# Altium PCB PCB.PcbDoc (part 2 of 2)
Units mm, origin at the board's own origin, x right, y up, seen from the top; angles counter-clockwise.
Board outline 38 x 40 mm, 4 copper layers (Top Layer, Inner GND 1, Inner GND 2, Bottom Layer), stack 1.62 mm thick; 82 components, 76 nets, 342 pads, 250 vias.
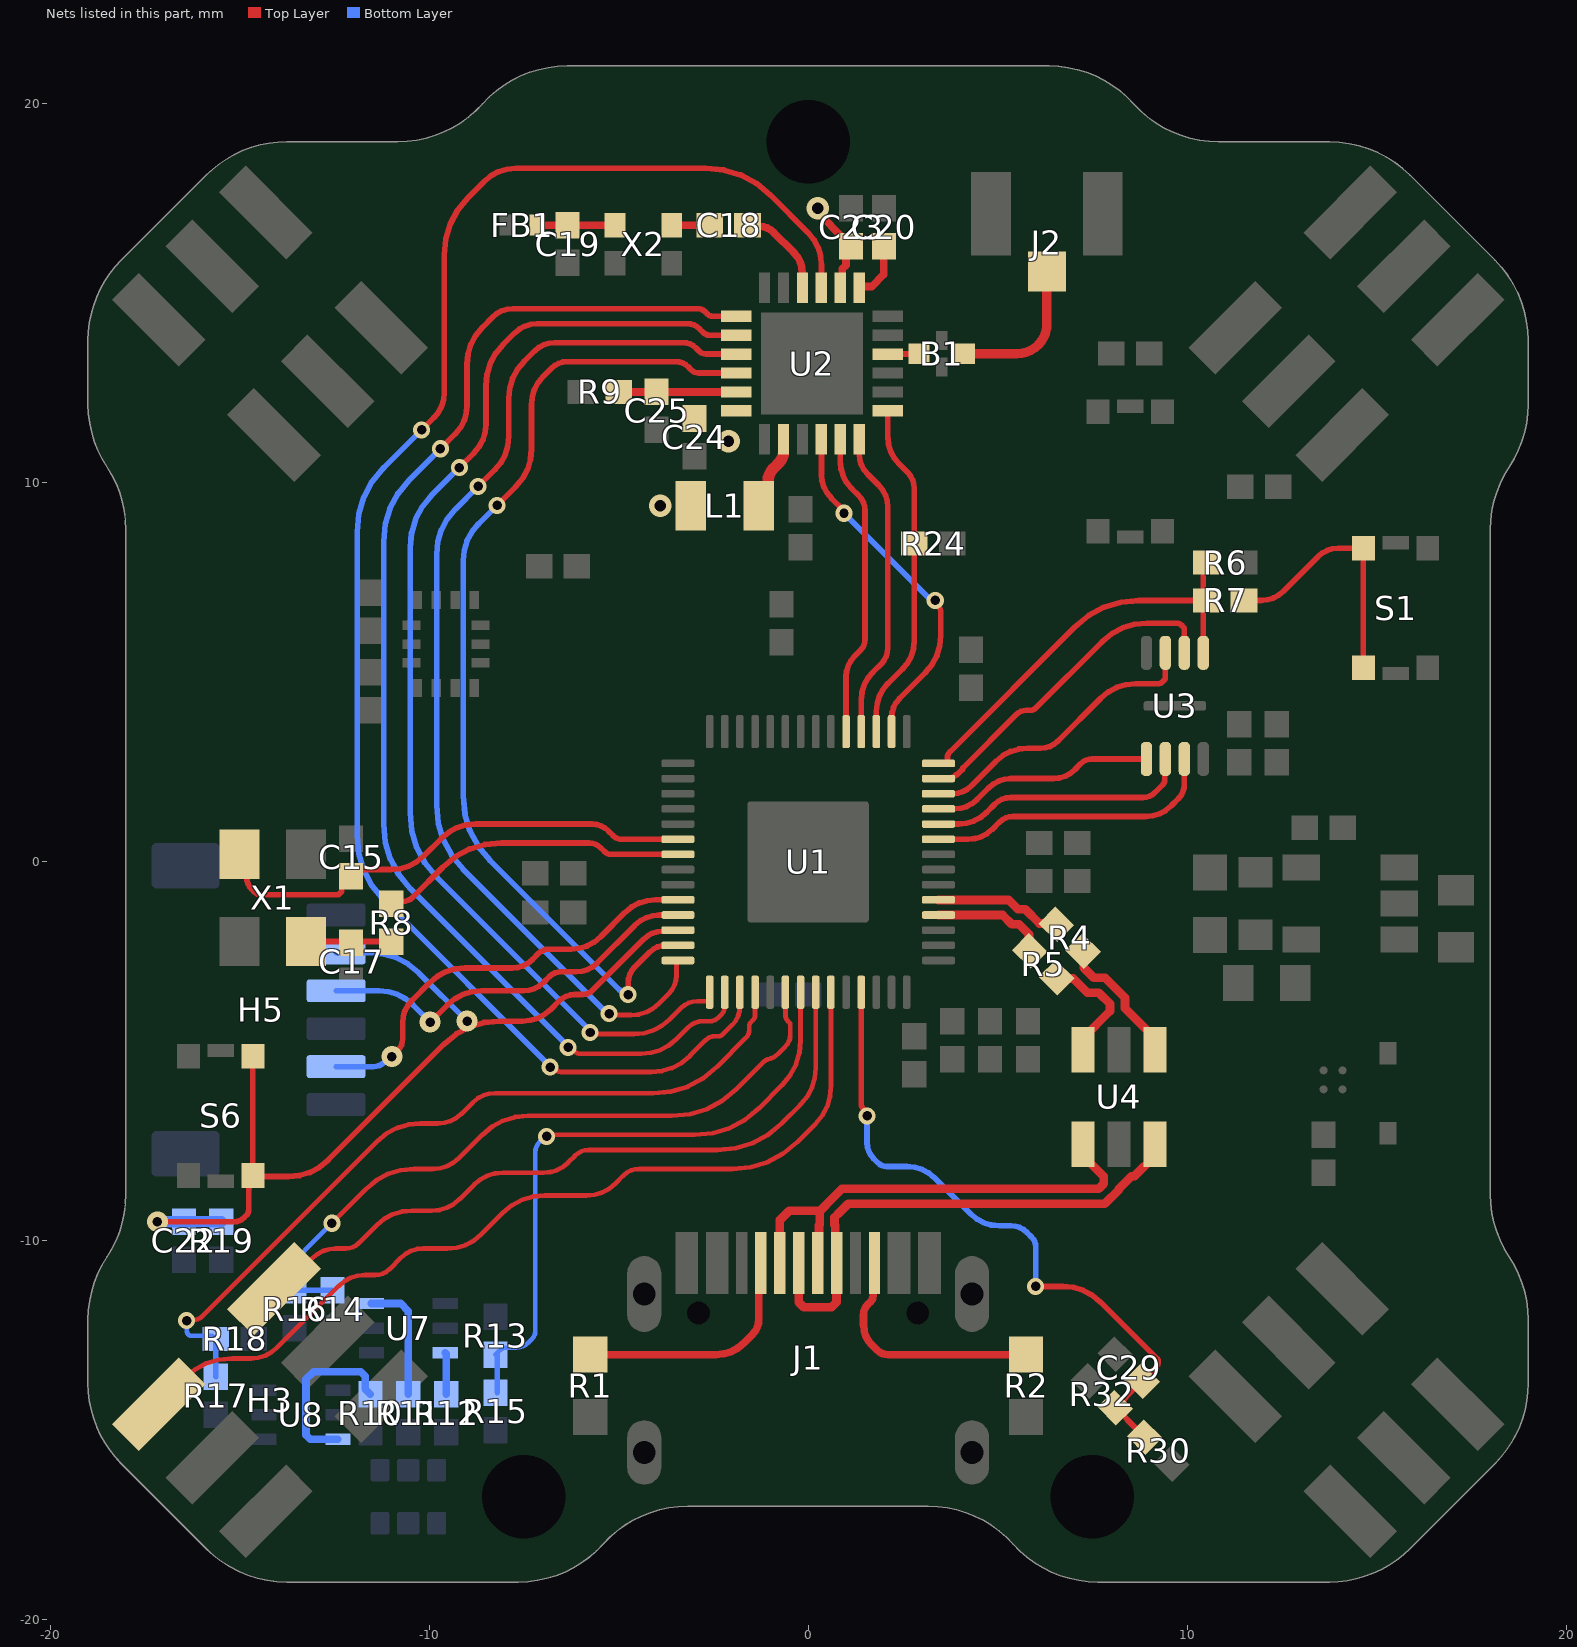
[diagram p4: the nets of this part, all layers, seen from the top]

## Via types
v1: diameter 0.55, hole 0.25, Top Layer to Bottom Layer, tented both sides, 204 vias
v2: diameter 0.45, hole 0.25, Top Layer to Bottom Layer, tented both sides, 30 vias
v3: diameter 0.6, hole 0.3, Top Layer to Bottom Layer, tented both sides, 10 vias
v4: diameter 0.5, hole 0.25, Top Layer to Bottom Layer, tented both sides, 3 vias
v5: diameter 0.5, hole 0.3, Top Layer to Bottom Layer, tented both sides, 2 vias
v6: diameter 0.45, hole 0.2, Top Layer to Bottom Layer, tented both sides, 1 vias

## Nets (pads, with @x,y where several pads share a name; then routed paths per layer and width w, separated by ;. In a path a pad name is that pad's centre, name@x,y a point inside that pad or via, vN(x,y) a via of type N, cw(c..) or ccw(c..) an arc to the next point about the centre after c; other vN are vias at no path point) (continued)
MCU_RGB_B: R17.1 R18.1 U1.32 | length 21
  Top Layer w0.125: v2(-16.4,-12.1) -16.391,-12.091 -16.387,-12.088 -16.383,-12.085 -16.378,-12.084 -16.373,-12.083 -16.214,-12.083 -16.151,-12.078 -16.093,-12.06 -16.04,-12.032 -15.991,-11.991 -11.377,-7.377 -11.126,-7.168 -10.851,-7.019 -10.55,-6.93 -10.225,-6.9 -9.771,-6.9 -9.592,-6.884 -9.427,-6.834 -9.276,-6.752 -9.137,-6.637 -8.842,-6.342 -8.715,-6.236 -8.575,-6.16 -8.423,-6.115 -8.258,-6.1 -4.084,-6.1 -3.61,-6.057 -3.172,-5.926 -2.77,-5.709 -2.404,-5.404 -1.644,-4.644 -1.605,-4.597 -1.577,-4.545 -1.56,-4.488 -1.554,-4.426 -1.554,-4.341 -1.551,-4.307 -1.542,-4.276 -1.526,-4.247 -1.504,-4.221 -1.447,-4.164 -1.426,-4.139 -1.412,-4.112 -1.403,-4.082 -1.4,-4.05 U1.32@-1.4,-3.437
  Bottom Layer w0.125: v2(-16.4,-12.1) -16.396,-12.104 -16.395,-12.105 -16.394,-12.107 -16.394,-12.109 -16.393,-12.111 -16.393,-12.38 -16.391,-12.403 -16.385,-12.423 -16.375,-12.442 -16.36,-12.46 -16.338,-12.482 -16.329,-12.49 -16.318,-12.495 -16.307,-12.499 -16.295,-12.5 -15.775,-12.5 -15.748,-12.502 -15.723,-12.51 -15.701,-12.522 -15.68,-12.539 R18.1@-15.654,-12.566
  Bottom Layer w0.15: R18.1@-15.654,-12.566 -15.644,-12.577 -15.637,-12.589 -15.633,-12.603 -15.632,-12.618 R17.1@-15.632,-13.587
MCU_RGB_G: R14.1 R16.1 U1.34 | length 18.2
  Top Layer w0.125: v2(-12.567,-9.533) -11.654,-8.62 -11.381,-8.393 -11.08,-8.23 -10.753,-8.132 -10.399,-8.1 -9.904,-8.1 -9.71,-8.082 -9.53,-8.028 -9.364,-7.939 -9.214,-7.814 -8.601,-7.201 -8.338,-6.982 -8.048,-6.825 -7.733,-6.731 -7.391,-6.7 -3.6,-6.7 -3.118,-6.656 -2.673,-6.523 -2.265,-6.302 -1.893,-5.993 -1.171,-5.271 -1.148,-5.251 -1.123,-5.234 -1.097,-5.22 -1.068,-5.21 -0.995,-5.188 -0.943,-5.169 -0.894,-5.144 -0.848,-5.113 -0.807,-5.076 -0.603,-4.872 -0.545,-4.802 -0.504,-4.726 -0.479,-4.643 -0.471,-4.554 -0.471,-4.354 -0.471,-4.34 -0.471,-4.326 -0.471,-4.312 -0.472,-4.299 -0.473,-4.265 -0.489,-4.246 -0.533,-4.201 -0.563,-4.166 -0.583,-4.127 -0.596,-4.085 -0.6,-4.04 U1.34@-0.6,-3.437
  Bottom Layer w0.125: R16.1@-13.528,-11.277 -13.512,-11.262 -13.507,-11.256 -13.503,-11.249 -13.501,-11.241 -13.5,-11.232 -13.5,-10.811 -13.485,-10.645 -13.439,-10.491 -13.363,-10.35 -13.256,-10.222 v2(-12.567,-9.533)
  Bottom Layer w0.15: R16.1@-13.528,-11.277 -13.536,-11.294 -13.518,-11.3 R14.1@-12.55,-11.3
MCU_RGB_R: R13.1 R15.1 U1.35 | length 16.8
  Top Layer w0.125: v2(-6.9,-7.241) -6.877,-7.219 -6.867,-7.211 -6.857,-7.205 -6.845,-7.201 -6.832,-7.2 -3,-7.2 -2.518,-7.156 -2.073,-7.023 -1.665,-6.802 -1.293,-6.493 -0.692,-5.892 -0.477,-5.633 -0.323,-5.349 -0.231,-5.04 -0.2,-4.704 U1.35@-0.2,-3.437
  Bottom Layer w0.125: R13.1@-8.25,-13 -8.149,-12.899 -8.105,-12.862 -8.057,-12.836 -8.005,-12.821 -7.948,-12.816 -7.71,-12.816 -7.617,-12.807 -7.53,-12.781 -7.45,-12.738 -7.378,-12.678 -7.28,-12.58 -7.245,-12.538 -7.22,-12.492 -7.205,-12.441 -7.2,-12.387 -7.2,-7.665 -7.193,-7.585 -7.171,-7.512 -7.135,-7.445 -7.084,-7.384 -6.955,-7.255 -6.948,-7.249 -6.94,-7.245 -6.932,-7.242 -6.923,-7.241 v2(-6.9,-7.241)
  Bottom Layer w0.15: R15.1@-8.2,-14 R13.1@-8.2,-13
MCU_RUN: C22.2 H5.5 R19.1 S6.3 S6.4 U1.26 | length 26
  Top Layer w0.15: v1(-17.169,-9.492) -15.139,-9.492 -15.068,-9.486 -15.003,-9.466 -14.943,-9.434 -14.888,-9.388 -14.818,-9.318 -14.793,-9.288 -14.775,-9.255 -14.765,-9.219 -14.761,-9.18 -14.761,-8.668 -14.755,-8.599 -14.736,-8.535 -14.704,-8.477 -14.66,-8.424 -14.592,-8.356 -14.562,-8.331 -14.53,-8.314 -14.495,-8.303 -14.457,-8.3 -13.711,-8.3 -13.417,-8.273 -13.145,-8.192 -12.895,-8.057 -12.668,-7.868 -9.605,-4.805 -9.287,-4.54 -8.937,-4.351 -8.557,-4.238 -8.145,-4.2 -7.545,-4.2 -7.331,-4.18 -7.133,-4.121 -6.951,-4.023 -6.785,-3.885 -6.573,-3.673 -6.482,-3.597 -6.382,-3.543 -6.273,-3.511 -6.155,-3.5 -5.96,-3.5 -5.883,-3.493 -5.812,-3.472 -5.746,-3.436 -5.687,-3.387 -4.336,-2.036 -4.225,-1.944 -4.103,-1.878 -3.97,-1.838 -3.827,-1.825 -3.478,-1.825 -3.471,-1.824 -3.464,-1.822 -3.457,-1.819 -3.451,-1.814 U1.26@-3.437,-1.8 ; S6.3@-14.65,-8.275 S6.4@-14.65,-5.125
  Bottom Layer w0.15: H5.5@-12.455,-2.4 -11.545,-2.4 -11.186,-2.433 -10.855,-2.532 -10.55,-2.696 -10.273,-2.927 v1(-9,-4.2)
  Bottom Layer w0.3: v1(-17.169,-9.492) -16.784,-9.492 -16.627,-9.492 C22.2@-16.469,-9.492 -16.312,-9.492 -16.154,-9.492 R19.1@-15.485,-9.492
MCU_SENSE_VBAT: C29.2 R30.1 R32.2 U1.39 | length 17.3
  Top Layer w0.15: U1.39@1.4,-3.437 1.4,-6.367 1.404,-6.414 1.417,-6.458 1.439,-6.498 1.469,-6.534 1.528,-6.593 1.539,-6.607 1.548,-6.621 1.552,-6.638 1.554,-6.655 v2(1.554,-6.7) ; v2(6,-11.2) 6.715,-11.2 6.997,-11.226 7.257,-11.303 7.496,-11.433 7.714,-11.614 9.216,-13.116 9.226,-13.128 9.232,-13.14 9.237,-13.154 9.238,-13.169 9.238,-13.206 9.235,-13.233 9.228,-13.258 9.216,-13.281 9.198,-13.302 8.982,-13.518 8.895,-13.605 C29.2@8.807,-13.693 8.72,-13.78 8.632,-13.868 8.418,-14.082 8.299,-14.241 8.259,-14.4 8.299,-14.559 8.418,-14.718 R30.1@8.878,-15.178
  Bottom Layer w0.15: v2(1.554,-6.7) 1.554,-7.407 1.565,-7.524 1.597,-7.633 1.651,-7.732 1.727,-7.823 1.843,-7.939 1.892,-7.981 1.947,-8.01 2.007,-8.028 2.072,-8.034 2.601,-8.034 2.81,-8.053 3.002,-8.111 3.179,-8.206 3.34,-8.34 4.282,-9.282 4.449,-9.421 4.633,-9.52 4.833,-9.58 5.05,-9.6 5.353,-9.6 5.472,-9.611 5.582,-9.644 5.683,-9.698 5.775,-9.775 5.901,-9.901 5.946,-9.955 5.978,-10.015 5.998,-10.08 6.004,-10.15 v2@6.004,-11.193 ; v2(6,-11.2) v2@6.002,-11.198
MCU_SWCLK: H5.2 U1.24 | length 11.1
  Top Layer w0.15: v1(-10.984,-5.137) v1@-10.984,-5.135 ; v1@-10.982,-5.132 -10.827,-4.977 -10.771,-4.91 -10.732,-4.836 -10.708,-4.756 -10.7,-4.67 -10.7,-4.246 -10.685,-4.08 -10.639,-3.925 -10.562,-3.784 -10.455,-3.655 -9.985,-3.185 -9.782,-3.016 -9.56,-2.896 -9.318,-2.824 -9.056,-2.8 -7.818,-2.8 -7.665,-2.786 -7.523,-2.744 -7.393,-2.673 -7.275,-2.575 -7.124,-2.424 -7.059,-2.37 -6.987,-2.331 -6.909,-2.308 -6.825,-2.3 -6.261,-2.3 -6.039,-2.28 -5.834,-2.218 -5.645,-2.117 -5.474,-1.974 -4.838,-1.338 -4.66,-1.19 -4.465,-1.085 -4.252,-1.021 -4.022,-1 U1.24@-3.437,-1
  Bottom Layer w0.15: H5.2@-12.455,-5.4 -11.467,-5.4 -11.387,-5.393 -11.312,-5.37 -11.244,-5.334 -11.182,-5.282 -11.055,-5.155 -11.046,-5.147 -11.036,-5.142 -11.025,-5.139 -11.013,-5.137 v1(-10.984,-5.137)
MCU_SWD: H5.4 U1.25 | length 10.3
  Top Layer w0.15: v1(-9.973,-4.227) -9.518,-3.772 -9.322,-3.609 -9.107,-3.493 -8.873,-3.423 -8.619,-3.4 -7.518,-3.4 -7.365,-3.386 -7.223,-3.344 -7.093,-3.273 -6.975,-3.175 -6.824,-3.024 -6.759,-2.97 -6.687,-2.931 -6.609,-2.908 -6.525,-2.9 -6.126,-2.9 -5.969,-2.886 -5.824,-2.842 -5.691,-2.77 -5.569,-2.669 -4.574,-1.674 -4.43,-1.554 -4.272,-1.469 -4.099,-1.417 -3.912,-1.4 U1.25@-3.437,-1.4
  Bottom Layer w0.15: H5.4@-12.455,-3.4 -11.326,-3.4 -11.073,-3.423 -10.839,-3.493 -10.624,-3.609 -10.428,-3.772 v1(-9.973,-4.227)
MCU_UART1_RX: H3.3 U1.37 | length 23.5
  Top Layer w0.125: H3.3@-17.134,-14.306 -16.447,-13.618 -16.174,-13.391 -15.875,-13.23 -15.549,-13.132 -15.196,-13.1 -14.703,-13.1 -14.509,-13.082 -14.33,-13.029 -14.165,-12.94 -14.015,-12.815 -12.386,-11.186 -12.236,-11.061 -12.07,-10.972 -11.89,-10.918 -11.695,-10.9 -11.423,-10.9 -11.315,-10.89 -11.216,-10.861 -11.125,-10.811 -11.042,-10.742 -10.744,-10.444 -10.616,-10.337 -10.475,-10.261 -10.321,-10.215 -10.155,-10.2 -9.52,-10.2 -9.269,-10.177 -9.038,-10.108 -8.826,-9.993 -8.633,-9.833 -8.065,-9.265 -7.82,-9.061 -7.552,-8.916 -7.259,-8.829 -6.943,-8.8 -5.845,-8.8 -5.631,-8.78 -5.433,-8.721 -5.251,-8.623 -5.085,-8.485 -4.873,-8.273 -4.782,-8.197 -4.682,-8.143 -4.573,-8.111 -4.455,-8.1 -2,-8.1 -1.518,-8.056 -1.073,-7.923 -0.665,-7.702 -0.293,-7.393 0.198,-6.902 0.374,-6.69 0.5,-6.458 0.575,-6.205 0.6,-5.932 U1.37@0.6,-3.437
MCU_UART1_TX: H3.4 U1.36 | length 18.6
  Top Layer w0.125: H3.4@-14.094,-11.266 -13.985,-11.266 -13.942,-11.262 -13.902,-11.25 -13.866,-11.23 -13.832,-11.202 -13.094,-10.464 -12.955,-10.349 -12.803,-10.266 -12.636,-10.217 -12.457,-10.2 -12.205,-10.2 -12.106,-10.191 -12.015,-10.164 -11.931,-10.118 -11.855,-10.055 -11.385,-9.585 -11.182,-9.416 -10.96,-9.296 -10.718,-9.224 -10.456,-9.2 -9.93,-9.2 -9.723,-9.181 -9.531,-9.124 -9.356,-9.029 -9.196,-8.896 -8.813,-8.513 -8.648,-8.376 -8.468,-8.278 -8.27,-8.22 -8.057,-8.2 -6.982,-8.2 -6.798,-8.183 -6.628,-8.132 -6.472,-8.048 -6.33,-7.93 -6.148,-7.748 -6.07,-7.684 -5.985,-7.637 -5.891,-7.609 -5.79,-7.6 -2.4,-7.6 -1.918,-7.556 -1.473,-7.423 -1.065,-7.202 -0.693,-6.893 -0.202,-6.402 -0.026,-6.19 0.1,-5.958 0.175,-5.705 0.2,-5.432 U1.36@0.2,-3.437
MCU_USB_D_N: R5.2 U4.3 | length 3.2
  Top Layer w0.23: R5.2@6.554,-3.054 6.575,-3.075 6.995,-3.075 7.371,-3.45 7.67,-3.45 7.965,-3.745 7.965,-3.935 7.25,-4.65 U4.3@7.25,-4.95
MCU_USB_D_P: R4.2 U4.1 | length 3.6
  Top Layer w0.23: R4.2@7.254,-2.354 7.275,-2.375 7.275,-2.795 7.535,-3.055 7.834,-3.055 8.36,-3.581 8.36,-3.86 9.15,-4.65 U4.1@9.15,-4.95
MCU_USB_TERM_D_N: R5.1 U1.46 | length 3
  Top Layer w0.23: U1.46@3.437,-1.4 3.44,-1.398 5.127,-1.398 5.374,-1.645 5.565,-1.645 5.825,-1.905 5.825,-2.325 R5.1@5.846,-2.346
MCU_USB_TERM_D_P: R4.1 U1.47 | length 3.4
  Top Layer w0.23: U1.47@3.437,-1 3.44,-1.002 5.29,-1.002 5.537,-1.25 5.729,-1.25 6.105,-1.625 6.525,-1.625 R4.1@6.546,-1.646
N_USB_BOOT: R7.2 S1.3 S1.4 | length 6.5
  Top Layer w0.15: R7.2@11.5,6.9 11.94,6.9 12.113,6.916 12.274,6.964 12.421,7.043 12.555,7.155 13.46,8.06 13.573,8.154 13.697,8.221 13.832,8.262 13.979,8.275 S1.3@14.35,8.275 ; S1.4@14.65,5.125 S1.3@14.65,8.275
NetC17_1: C17.1 R8.1 X1.3 | length 2.3
  Top Layer w0.15: X1.3@-13.25,-2.1 R8.1@-11,-2.1
QSPI_SCLK: U1.52 U3.6 | length 7
  Top Layer w0.15: U1.52@3.437,1 3.967,1 4.176,1.019 4.368,1.077 4.545,1.172 4.706,1.306 4.923,1.523 5.016,1.6 5.118,1.656 5.23,1.689 5.351,1.7 8.828,1.7 8.92,1.708 9.005,1.734 9.083,1.776 9.154,1.835 9.319,2 9.368,2.048 9.385,2.069 9.397,2.092 9.405,2.117 9.407,2.144 9.407,2.687 9.408,2.692 9.409,2.698 9.412,2.703 9.415,2.707 U3.6@9.426,2.717
QSPI_SD0: U1.53 U3.5 | length 5.9
  Top Layer w0.15: U1.53@3.437,1.4 3.861,1.4 4.028,1.415 4.183,1.461 4.325,1.538 4.454,1.645 4.759,1.95 4.89,2.06 5.034,2.138 5.191,2.184 5.361,2.2 6.471,2.2 6.629,2.215 6.776,2.258 6.91,2.331 7.033,2.433 7.189,2.589 7.256,2.645 7.33,2.685 7.411,2.709 7.498,2.717 U3.5@8.926,2.717
QSPI_SD1: U1.55 U3.2 | length 8.8
  Top Layer w0.15: U1.55@3.437,2.2 3.451,2.214 3.457,2.219 3.464,2.222 3.471,2.224 3.478,2.225 3.779,2.225 3.801,2.227 3.822,2.233 3.841,2.243 3.858,2.258 3.888,2.288 3.893,2.292 3.899,2.296 3.905,2.297 3.912,2.298 3.922,2.298 3.925,2.298 3.929,2.299 3.932,2.301 3.935,2.303 4.067,2.436 4.071,2.441 4.075,2.447 4.076,2.453 4.077,2.46 4.077,2.469 4.077,2.473 4.078,2.476 4.08,2.48 4.082,2.482 5.49,3.89 5.548,3.938 5.611,3.972 5.681,3.993 5.756,4 5.86,4 5.901,4.004 5.94,4.015 5.975,4.034 6.006,4.061 7.751,5.805 8.011,6.022 8.297,6.176 8.608,6.269 8.945,6.3 9.72,6.3 9.759,6.296 9.794,6.286 9.827,6.268 9.857,6.243 9.895,6.205 9.908,6.189 9.918,6.171 9.924,6.151 9.926,6.13 U3.2@9.926,5.517
QSPI_SD2: U1.54 U3.3 | length 7.8
  Top Layer w0.15: U1.54@3.437,1.8 3.802,1.8 3.945,1.813 4.078,1.853 4.2,1.919 4.311,2.011 4.95,2.65 5.134,2.803 5.336,2.912 5.557,2.978 5.795,3 6.128,3 6.259,3.012 6.38,3.048 6.491,3.108 6.593,3.193 7.718,4.318 7.919,4.485 8.14,4.605 8.38,4.676 8.64,4.7 9.22,4.7 9.259,4.704 9.294,4.714 9.327,4.732 9.357,4.757 9.395,4.795 9.408,4.811 9.418,4.829 9.424,4.849 9.426,4.87 U3.3@9.426,5.517
QSPI_SD3: U1.51 U3.7 | length 7.8
  Top Layer w0.15: U1.51@3.437,0.6 4.218,0.6 4.402,0.617 4.572,0.667 4.728,0.752 4.87,0.87 5.051,1.051 5.13,1.116 5.215,1.163 5.309,1.191 5.41,1.2 8.902,1.2 9.094,1.218 9.271,1.27 9.434,1.358 9.582,1.482 9.771,1.671 9.839,1.752 9.887,1.842 9.916,1.939 9.926,2.045 U3.7@9.926,2.717
QSPI_SS: R6.1 R7.1 U1.56 U3.1 | length 11.1
  Top Layer w0.15: U1.56@3.437,2.6 3.634,2.6 3.641,2.601 3.648,2.603 3.655,2.606 3.661,2.611 3.668,2.619 3.671,2.622 3.673,2.626 3.674,2.63 3.675,2.634 3.675,2.746 3.679,2.79 3.691,2.83 3.711,2.868 3.739,2.902 7.03,6.193 7.402,6.502 7.811,6.723 8.256,6.856 8.737,6.9 R7.1@10.4,6.9 ; R6.1@10.4,7.9 10.414,7.886 10.419,7.88 10.423,7.873 10.425,7.866 10.426,7.858 10.426,7.338 10.426,7.119 10.426,6.9 10.426,6.681 10.426,6.462 U3.1@10.426,5.517
RF: B1.3 J2.1 | length 4
  Top Layer w0.25: B1.3@4.123,13.409 5.509,13.409 ccw(c5.509,14.2) 6.3,14.2 J2.1@6.3,15.575
RFIO: B1.1 U2.22 | length 0.8
  Top Layer w0.15: U2.22@2.1,13.4 2.913,13.4 B1.1@2.923,13.409
RGB_B: R10.2 U8.6 | length 4.6
  Bottom Layer w0.2: U8.6@-12.407,-15.237 -13.133,-15.237 -13.25,-15.12 -13.25,-13.65 -13.05,-13.45 -11.8,-13.45 -11.683,-13.567 -11.683,-13.917 R10.2@-11.55,-14.05
RGB_G: R12.2 U7.3 | length 1.1
  Bottom Layer w0.2: U7.3@-9.575,-12.95 -9.55,-12.975 R12.2@-9.55,-14.05
RGB_R: R11.2 U7.6 | length 3.3
  Bottom Layer w0.2: U7.6@-11.525,-11.65 -10.75,-11.65 -10.55,-11.85 R11.2@-10.55,-14.05
SX_BUSY: U1.30 U2.7 | length 33.8
  Top Layer w0.125: v2(-6.336,-4.891) -6.301,-4.891 -6.287,-4.892 -6.274,-4.896 -6.262,-4.902 -6.251,-4.911 -6.168,-4.994 -6.132,-5.024 -6.093,-5.045 -6.05,-5.058 -6.004,-5.062 -4.411,-5.062 -4.147,-5.038 -3.902,-4.965 -3.678,-4.844 -3.474,-4.674 -3.171,-4.371 -3.081,-4.296 -2.982,-4.243 -2.874,-4.211 -2.758,-4.2 -2.595,-4.2 -2.53,-4.194 -2.471,-4.176 -2.417,-4.147 -2.367,-4.106 -2.281,-4.02 -2.251,-3.983 -2.229,-3.943 -2.215,-3.898 -2.211,-3.851 -2.211,-3.456 -2.211,-3.452 -2.21,-3.449 -2.208,-3.446 -2.206,-3.444 U1.30@-2.2,-3.437
  Top Layer w0.15: v2(-9.702,10.902) -9.316,11.288 -9.178,11.455 -9.079,11.637 -9.02,11.836 -9,12.051 -9,13.127 -8.975,13.403 -8.899,13.658 -8.772,13.892 -8.595,14.105 -8.323,14.377 -8.206,14.475 -8.077,14.544 -7.937,14.586 -7.785,14.6 -2.927,14.6 -2.866,14.594 -2.809,14.577 -2.757,14.549 -2.71,14.51 -2.649,14.45 -2.623,14.428 -2.595,14.412 -2.564,14.403 -2.53,14.4 U2.7@-1.9,14.4
  Bottom Layer w0.15: v2(-9.702,10.902) -10.526,10.078 -10.821,9.724 -11.031,9.335 -11.158,8.91 -11.2,8.451 -11.2,1 -11.156,0.518 -11.023,0.073 -10.802,-0.335 -10.493,-0.707 -6.344,-4.856 -6.34,-4.86 -6.338,-4.865 -6.336,-4.87 -6.336,-4.876 v2(-6.336,-4.891)
SX_DIO1: U1.29 U2.8 | length 30.9
  Top Layer w0.125: v2(-5.75,-4.5) -5.727,-4.523 -5.717,-4.531 -5.707,-4.537 -5.695,-4.54 -5.682,-4.541 -4.593,-4.541 -4.327,-4.517 -4.082,-4.444 -3.857,-4.322 -3.651,-4.151 -3.35,-3.85 -3.258,-3.773 -3.157,-3.718 -3.046,-3.686 -2.927,-3.675 -2.641,-3.675 -2.633,-3.674 -2.626,-3.672 -2.62,-3.668 -2.614,-3.663 -2.606,-3.656 -2.603,-3.653 -2.602,-3.649 -2.6,-3.645 -2.6,-3.641 U1.29@-2.6,-3.437
  Top Layer w0.15: v2(-9.204,10.404) -8.817,10.792 -8.678,10.958 -8.579,11.142 -8.52,11.341 -8.5,11.557 -8.5,12.564 -8.472,12.87 -8.388,13.153 -8.247,13.413 -8.05,13.65 -7.748,13.952 -7.617,14.061 -7.474,14.138 -7.319,14.185 -7.15,14.2 -3.191,14.2 -3.099,14.192 -3.014,14.166 -2.936,14.124 -2.865,14.065 -2.774,13.974 -2.735,13.942 -2.692,13.919 -2.646,13.905 -2.595,13.9 U2.8@-1.9,13.9
  Bottom Layer w0.15: v2(-9.204,10.404) -9.917,9.692 -10.172,9.385 -10.354,9.048 -10.464,8.681 -10.5,8.284 -10.5,1.3 -10.456,0.818 -10.323,0.373 -10.102,-0.035 -9.793,-0.407 -5.766,-4.434 -5.759,-4.442 -5.754,-4.452 -5.751,-4.462 -5.75,-4.472 v2(-5.75,-4.5)
SX_DIO2: U1.28 U2.9 | length 28.4
  Top Layer w0.125: v2(-5.25,-4) -5.227,-4.023 -5.217,-4.031 -5.207,-4.037 -5.195,-4.04 -5.182,-4.042 -4.665,-4.042 -4.461,-4.023 -4.272,-3.967 -4.1,-3.873 -3.942,-3.742 -3.678,-3.478 -3.589,-3.371 -3.526,-3.254 -3.488,-3.126 -3.475,-2.988 -3.475,-2.661 -3.474,-2.65 -3.471,-2.639 -3.466,-2.629 -3.458,-2.621 U1.28@-3.437,-2.6
  Top Layer w0.15: v2(-8.707,9.907) -8.263,10.35 -8.104,10.541 -7.991,10.751 -7.923,10.979 -7.9,11.226 -7.9,12.227 -7.875,12.503 -7.799,12.758 -7.672,12.992 -7.495,13.205 -7.223,13.477 -7.106,13.575 -6.977,13.644 -6.837,13.686 -6.685,13.7 -3.291,13.7 -3.199,13.692 -3.114,13.666 -3.036,13.624 -2.965,13.565 -2.874,13.474 -2.835,13.442 -2.792,13.419 -2.746,13.405 -2.695,13.4 U2.9@-1.9,13.4
  Bottom Layer w0.15: v2(-8.707,9.907) -9.308,9.305 -9.523,9.046 -9.677,8.762 -9.769,8.453 -9.8,8.117 -9.8,1.5 -9.756,1.018 -9.623,0.573 -9.402,0.165 -9.093,-0.207 -5.316,-3.984 -5.308,-3.991 -5.298,-3.996 -5.288,-3.999 -5.278,-4 v2(-5.25,-4)
SX_DIO3: U1.27 U2.10 | length 26.2
  Top Layer w0.15: v2(-8.209,9.409) -7.709,9.909 -7.53,10.124 -7.402,10.36 -7.326,10.617 -7.3,10.896 -7.3,12.055 -7.28,12.269 -7.221,12.467 -7.123,12.649 -6.985,12.815 -6.773,13.027 -6.682,13.103 -6.582,13.157 -6.473,13.189 -6.355,13.2 -3.491,13.2 -3.399,13.192 -3.314,13.166 -3.236,13.124 -3.165,13.065 -3.074,12.974 -3.035,12.942 -2.992,12.919 -2.946,12.905 -2.895,12.9 U2.10@-1.9,12.9 ; v2(-4.75,-3.5) -4.75,-3.198 -4.739,-3.078 -4.706,-2.968 -4.652,-2.867 -4.575,-2.775 -4.179,-2.379 -4.085,-2.301 -3.981,-2.245 -3.869,-2.211 -3.747,-2.2 U1.27@-3.437,-2.2
  Bottom Layer w0.15: v2(-8.209,9.409) -8.699,8.919 -8.874,8.708 -9,8.476 -9.075,8.224 -9.1,7.95 -9.1,1.746 -9.056,1.264 -8.923,0.819 -8.702,0.411 -8.393,0.039 -4.978,-3.377 -4.974,-3.38 -4.97,-3.382 -4.965,-3.383 -4.96,-3.384 -4.953,-3.384 -4.95,-3.384 -4.948,-3.385 -4.945,-3.386 -4.943,-3.388 -4.857,-3.474 -4.843,-3.485 -4.829,-3.494 -4.812,-3.498 -4.795,-3.5 v2(-4.75,-3.5)
SX_MISO_TX: U1.2 U2.16 | length 9.5
  Top Layer w0.15: U2.16@0.35,11.15 0.35,10.237 0.367,10.055 0.417,9.886 0.501,9.731 0.618,9.59 0.926,9.282 0.935,9.272 0.941,9.26 0.945,9.248 0.946,9.234 v2(0.946,9.2) ; U1.2@2.2,3.437 2.2,3.802 2.213,3.945 2.253,4.078 2.319,4.2 2.411,4.311 3.095,4.995 3.272,5.208 3.399,5.442 3.475,5.697 3.5,5.973 3.5,6.596 3.497,6.633 3.486,6.667 3.47,6.698 3.446,6.727 3.38,6.793 3.369,6.807 3.36,6.821 3.356,6.838 3.354,6.855 v2(3.354,6.9)
  Bottom Layer w0.15: v2(0.946,9.2) 3.154,6.992 3.172,6.977 3.192,6.966 3.214,6.96 3.237,6.957 3.27,6.957 3.283,6.956 3.295,6.953 3.306,6.947 3.315,6.939 v2(3.354,6.9)
SX_MOSI_RX: U1.5 U2.17 | length 8.1
  Top Layer w0.15: U2.17@0.85,11.15 0.85,10.564 0.868,10.364 0.923,10.18 1.015,10.011 1.143,9.858 1.339,9.661 1.41,9.576 1.46,9.483 1.49,9.382 1.5,9.272 1.5,5.875 1.492,5.791 1.469,5.713 1.43,5.641 1.376,5.576 1.225,5.425 1.127,5.307 1.056,5.177 1.014,5.035 1,4.882 U1.5@1,3.437
SX_NRESET: U1.31 U2.3 | length 43.5
  Top Layer w0.125: v2(-6.81,-5.411) -6.762,-5.411 -6.742,-5.413 -6.725,-5.418 -6.709,-5.427 -6.694,-5.439 -6.638,-5.495 -6.613,-5.516 -6.587,-5.53 -6.558,-5.539 -6.526,-5.542 -4.141,-5.542 -3.852,-5.515 -3.585,-5.436 -3.341,-5.303 -3.118,-5.118 -2.695,-4.695 -2.645,-4.654 -2.59,-4.624 -2.53,-4.606 -2.465,-4.6 -2.374,-4.6 -2.338,-4.597 -2.305,-4.587 -2.275,-4.57 -2.248,-4.547 -2.001,-4.301 -1.913,-4.195 -1.85,-4.079 -1.813,-3.952 -1.8,-3.815 U1.31@-1.8,-3.437
  Top Layer w0.15: v2(-10.2,11.4) -9.87,11.73 -9.752,11.872 -9.668,12.028 -9.617,12.198 -9.6,12.382 -9.6,16.009 -9.561,16.438 -9.443,16.835 -9.246,17.199 -8.97,17.53 -8.547,17.953 -8.364,18.105 -8.164,18.213 -7.946,18.278 -7.71,18.3 -2.7,18.3 -2.218,18.256 -1.773,18.123 -1.365,17.902 -0.993,17.593 0,16.6 0.153,16.416 0.262,16.214 0.328,15.993 0.35,15.755 U2.3@0.35,15.15
  Bottom Layer w0.15: v2(-10.2,11.4) -11.193,10.407 -11.502,10.035 -11.723,9.627 -11.856,9.182 -11.9,8.7 -11.9,0.7 -11.856,0.218 -11.723,-0.227 -11.502,-0.635 -11.193,-1.007 -6.817,-5.383 -6.814,-5.387 -6.812,-5.391 -6.81,-5.395 -6.81,-5.399 v2(-6.81,-5.411)
SX_NSS_CTS: R24.1 U1.3 U2.19 | length 9.1
  Top Layer w0.15: U1.3@1.8,3.437 1.8,3.967 1.819,4.176 1.877,4.368 1.972,4.545 2.106,4.706 2.488,5.088 2.624,5.252 2.722,5.432 2.78,5.629 2.8,5.841 2.8,7.635 2.8,8.018 R24.1@2.8,8.4 2.8,8.782 2.8,9.165 2.8,9.855 2.789,9.973 2.757,10.082 2.703,10.182 2.627,10.273 2.415,10.485 2.277,10.651 2.179,10.833 2.12,11.031 2.1,11.245 U2.19@2.1,11.95
SX_SCK_RTSN: U1.4 U2.18 | length 8.2
  Top Layer w0.15: U2.18@1.35,11.15 1.35,10.765 1.364,10.613 1.406,10.473 1.475,10.344 1.573,10.227 1.863,9.937 1.967,9.812 2.041,9.675 2.085,9.526 2.1,9.364 2.1,5.645 2.089,5.527 2.057,5.418 2.003,5.318 1.927,5.227 1.715,5.015 1.577,4.849 1.479,4.667 1.42,4.469 1.4,4.255 U1.4@1.4,3.437
TCXO: C18.1 X2.3 | length 1
  Top Layer w0.2: X2.3@-3.6,16.8 C18.1@-2.6,16.8
USB_CC1: J1.A5 R1.2 | length 6.4
  Top Layer w0.2: R1.2@-5.75,-13 -2.445,-13 -2.231,-12.98 -2.033,-12.921 -1.851,-12.823 -1.685,-12.685 -1.473,-12.473 -1.397,-12.382 -1.343,-12.282 -1.311,-12.173 -1.3,-12.055 -1.3,-10.662 -1.299,-10.646 -1.294,-10.632 -1.287,-10.619 -1.278,-10.607 J1.A5@-1.25,-10.58
USB_CC2: J1.B5 R2.2 | length 6.5
  Top Layer w0.2: J1.B5@1.75,-10.58 1.73,-10.6 1.722,-10.609 1.717,-10.619 1.714,-10.629 1.713,-10.641 1.713,-11.449 1.709,-11.492 1.697,-11.531 1.678,-11.567 1.651,-11.599 1.575,-11.675 1.525,-11.735 1.49,-11.8 1.468,-11.872 1.461,-11.949 1.461,-12.216 1.475,-12.363 1.515,-12.499 1.583,-12.623 1.677,-12.736 1.822,-12.881 1.884,-12.933 1.953,-12.97 2.027,-12.993 2.108,-13 R2.2@5.75,-13
USB_D_N: J1.A7 J1.B7 U4.4 | length 12.7
  Top Layer w0.23: J1.B7@-0.75,-10.58 -0.75,-9.45 -0.5,-9.2 0.287,-9.2 0.303,-9.215 ; J1.A7@0.25,-10.58 0.285,-10.545 0.285,-9.587 0.303,-9.57 0.303,-9.215 ; U4.4@7.25,-7.45 7.25,-7.75 7.8,-8.3 7.8,-8.49 7.665,-8.625 0.893,-8.625 0.669,-8.849 0.303,-9.215
USB_D_P: J1.A6 J1.B6 U4.6 | length 13.8
  Top Layer w0.23: J1.A6@-0.25,-10.58 -0.25,-11.615 -0.115,-11.75 0.615,-11.75 0.75,-11.615 J1.B6@0.75,-10.58 0.715,-10.545 0.715,-9.587 0.698,-9.57 0.698,-9.379 0.832,-9.244 1.057,-9.02 7.829,-9.02 8.195,-8.654 8.195,-8.63 8.532,-8.292 8.608,-8.292 9.15,-7.75 U4.6@9.15,-7.45
VBAT_IO: C25.2 R9.2 U2.11 | length 3.4
  Top Layer w0.2: R9.2@-5.3,12.4 -4.3,12.4 C25.2@-4,12.4 U2.11@-1.9,12.4
VDCC: C23.2 C24.2 L1.2 U2.2 U2.12 | length 2.6
  Top Layer w0.2: v3(0.25,17.25) 0.327,17.173 0.327,17.056 0.883,16.5 0.913,16.5 1.133,16.28 C23.2@1.133,16.25 1,16.117 1,15.75 0.9,15.65 0.9,15.2 U2.2@0.85,15.15
  other v3: -3.9,9.4 -2.1,11.1
VDCC2: L1.1 U2.14 | length 2
  Top Layer w0.3: L1.1@-1.3,9.4 -1.166,9.534 -1.118,9.591 -1.084,9.655 -1.064,9.723 -1.057,9.798 -1.057,10.043 -1.048,10.139 -1.021,10.229 -0.977,10.31 -0.915,10.385 -0.769,10.531 -0.717,10.593 -0.68,10.662 -0.657,10.737 -0.65,10.819 U2.14@-0.65,11.15
VDDFB: C19.2 FB1.2 X2.4 | length 1.9
  Top Layer w0.2: FB1.2@-7.249,16.804 C19.2@-6.349,16.804 ; C19.2@-6.1,16.8 X2.4@-5.1,16.8
VR_PA: C20.2 U2.1 | length 1.5
  Top Layer w0.2: U2.1@1.35,15.15 1.383,15.183 1.683,15.183 2,15.5 C20.2@2,16.25
XIN: C15.1 U1.20 X1.1 | length 13.2
  Top Layer w0.15: X1.1@-15,0.2 -14.897,0.097 -14.86,0.053 -14.834,0.004 -14.818,-0.049 -14.813,-0.106 -14.813,-0.407 -14.805,-0.494 -14.781,-0.574 -14.741,-0.647 -14.686,-0.714 -14.6,-0.8 -14.564,-0.83 -14.523,-0.852 -14.479,-0.865 -14.432,-0.869 -12.449,-0.869 -12.422,-0.867 -12.397,-0.86 -12.374,-0.847 -12.353,-0.83 -12.327,-0.803 -12.317,-0.792 -12.31,-0.779 -12.306,-0.766 -12.305,-0.751 -12.305,-0.683 -12.303,-0.656 -12.295,-0.631 -12.283,-0.609 -12.266,-0.588 -12.052,-0.375 -11.96,-0.298 -11.86,-0.244 -11.75,-0.211 -11.631,-0.2 -11.009,-0.2 -10.764,-0.178 -10.537,-0.11 -10.329,0.002 -10.14,0.16 -9.678,0.622 -9.479,0.787 -9.261,0.905 -9.023,0.976 -8.765,1 -5.711,1 -5.587,0.989 -5.473,0.955 -5.368,0.898 -5.272,0.818 -5.15,0.696 -5.098,0.652 -5.04,0.621 -4.977,0.602 -4.909,0.596 -4.552,0.596 ; -4.548,0.598 -4.547,0.599 ; -4.544,0.6 U1.20@-3.437,0.6
XOUT: R8.2 U1.21 | length 8.2
  Top Layer w0.15: R8.2@-11,-1.1 -10.969,-1.069 -10.955,-1.057 -10.94,-1.049 -10.924,-1.044 -10.907,-1.043 -10.707,-1.043 -10.628,-1.036 -10.555,-1.014 -10.488,-0.978 -10.427,-0.927 -9.642,-0.142 -9.304,0.139 -8.933,0.339 -8.529,0.46 -8.092,0.5 -5.791,0.5 -5.699,0.492 -5.614,0.466 -5.536,0.424 -5.465,0.365 -5.374,0.274 -5.335,0.242 -5.292,0.219 -5.246,0.205 -5.195,0.2 U1.21@-3.437,0.2
XTA: C18.2 U2.4 | length 2.5
  Top Layer w0.2: C18.2@-1.6,16.8 -1.582,16.782 -1.574,16.775 -1.566,16.771 -1.556,16.768 -1.546,16.767 -1.283,16.767 -1.179,16.758 -1.083,16.729 -0.995,16.681 -0.915,16.615 -0.373,16.073 -0.275,15.956 -0.206,15.827 -0.164,15.687 -0.15,15.535 U2.4@-0.15,15.15
pads on no net: B2.2 B2.3 B2.10 B2.11 H5.6 H5.SH1 H5.SH2 J1.11 J1.12 J1.A8 J1.B8 J1.SH U1.8 U2.5 U2.6 U3.9 U8.3 U8.4 U8.5

## Polygon pours and split planes (outlines as drawn)
GND on Top Layer "GND_L01_P033" (solid, remove dead copper, pour order 33): -15.88,-18.12 -18.123,-15.878 cw(c-16.001,-13.756) -19.001,-13.756 -19.001,-12.079 cw(c-16.001,-12.079) -18.501,-10.421 ccw(c-21.001,-8.763) -18.001,-8.763 -18.001,8.765 ccw(c-21.001,8.765) -18.501,10.423 cw(c-16.001,12.082) -19.001,12.082 -19.001,13.758 cw(c-16.001,13.758) -18.123,15.88 -15.88,18.122 cw(c-13.759,16.001) -13.759,19.001 -10.83,19.001 ccw(c-10.83,22.001) -8.594,20.001 cw(c-6.358,18.001) -6.358,21.001 6.355,21.001 cw(c6.355,18.001) 8.591,20.001 ccw(c10.827,22.001) 10.827,19.001 13.756,19.001 cw(c13.756,16.001) 15.877,18.122 18.12,15.88 cw(c15.999,13.758) 18.999,13.758 18.999,12.082 cw(c15.999,12.082) 18.499,10.423 ccw(c20.999,8.765) 17.999,8.765 17.999,-8.763 ccw(c20.999,-8.763) 18.499,-10.421 cw(c15.999,-12.079) 18.999,-12.079 18.999,-13.756 cw(c15.999,-13.756) 18.12,-15.878 15.877,-18.12 cw(c13.756,-15.999) 13.756,-18.999 7.642,-18.999 cw(c7.642,-15.999) 5.406,-17.999 ccw(c3.17,-19.999) 3.17,-16.999 -3.173,-16.999 ccw(c-3.173,-19.999) -5.409,-17.999 cw(c-7.645,-15.999) -7.645,-18.999 -13.759,-18.999 cw(c-13.759,-15.999)
+3V3 on Top Layer "+3V3_L01_P008" (solid, remove dead copper, pour order 8): -3.056,-2.862 2.644,-2.862 2.644,2.838 -3.056,2.838
+1V1 on Top Layer "+1V1_L01_P003" (solid, remove dead copper, pour order 3): 2.637,-1.978 1.647,-1.978 1.647,1.84 -2.03,1.84 -2.03,-0.776 -2.596,-0.776 -2.596,-0.211 -2.384,-0.211 -2.384,2.123 1.929,2.123 1.929,-0.847 2.637,-1.554
+3V3 on Top Layer "+3V3_L01_P025" (solid, remove dead copper, pour order 25): 11.531,-1.397 11.482,-1.399 11.434,-1.406 11.386,-1.418 11.34,-1.435 11.296,-1.456 11.254,-1.481 11.214,-1.51 11.178,-1.543 11.145,-1.58 11.115,-1.619 11.09,-1.661 11.069,-1.705 11.053,-1.752 11.041,-1.799 11.034,-1.848 11.031,-1.897 11.031,-2.07 11.033,-2.107 11.038,-2.144 11.048,-2.18 11.06,-2.216 11.076,-2.249 11.095,-2.281 11.118,-2.311 11.143,-2.339 11.17,-2.364 11.2,-2.386 11.232,-2.406 11.266,-2.422 11.301,-2.434 11.338,-2.443 11.375,-2.449 11.412,-2.451 11.427,-2.451 11.465,-2.452 11.502,-2.458 11.538,-2.467 11.573,-2.48 11.607,-2.496 11.639,-2.515 11.669,-2.537 11.697,-2.562 11.722,-2.59 11.744,-2.62 11.763,-2.652 11.779,-2.686 11.792,-2.721 11.801,-2.757 11.806,-2.794 11.808,-2.831 11.808,-3.744 11.811,-3.793 11.818,-3.841 11.83,-3.889 11.846,-3.935 11.867,-3.98 11.892,-4.022 11.922,-4.061 11.955,-4.097 11.991,-4.13 12.03,-4.16 12.072,-4.185 12.117,-4.206 12.163,-4.222 12.211,-4.234 12.259,-4.241 12.308,-4.244 13.408,-4.244 13.457,-4.241 13.506,-4.234 13.553,-4.222 13.599,-4.206 13.644,-4.185 13.686,-4.16 13.725,-4.13 13.762,-4.097 13.795,-4.061 13.824,-4.022 13.849,-3.98 13.87,-3.935 13.887,-3.889 13.899,-3.841 13.906,-3.793 13.908,-3.744 13.908,-1.898 13.906,-1.849 13.899,-1.801 13.887,-1.753 13.87,-1.707 13.849,-1.663 13.824,-1.621 13.795,-1.581 13.762,-1.545 13.725,-1.512 13.686,-1.483 13.644,-1.457 13.6,-1.436 13.554,-1.42 13.506,-1.408 13.457,-1.401 13.408,-1.398
+VSYS on Top Layer "+VSYS_L01_P018" (solid, remove dead copper, pour order 18): 13.608,-5.699 13.559,-5.696 13.511,-5.689 13.463,-5.677 13.417,-5.66 13.372,-5.64 13.33,-5.614 13.291,-5.585 13.255,-5.552 13.222,-5.516 13.192,-5.476 13.167,-5.434 13.146,-5.39 13.13,-5.344 13.118,-5.296 13.111,-5.248 13.108,-5.199 13.108,-4.999 13.111,-4.95 13.118,-4.901 13.13,-4.853 13.146,-4.807 13.167,-4.763 13.192,-4.721 13.222,-4.681 13.255,-4.645 13.291,-4.612 13.33,-4.583 13.372,-4.558 13.417,-4.537 13.463,-4.52 13.511,-4.508 13.559,-4.501 13.608,-4.499 14.108,-4.499 14.157,-4.496 14.206,-4.489 14.253,-4.477 14.299,-4.461 14.344,-4.44 14.386,-4.414 14.425,-4.385 14.462,-4.352 14.495,-4.316 14.524,-4.276 14.549,-4.234 14.57,-4.19 14.587,-4.144 14.599,-4.096 14.606,-4.048 14.608,-3.999 14.608,-2.099 14.611,-2.05 14.618,-2.001 14.63,-1.953 14.646,-1.907 14.667,-1.863 14.692,-1.821 14.722,-1.781 14.755,-1.745 14.791,-1.712 14.83,-1.683 14.872,-1.658 14.917,-1.637 14.963,-1.62 15.011,-1.608 15.059,-1.601 15.108,-1.599 17.008,-1.599 17.057,-1.601 17.106,-1.608 17.153,-1.62 17.199,-1.637 17.244,-1.658 17.286,-1.683 17.325,-1.712 17.362,-1.745 17.395,-1.781 17.424,-1.821 17.449,-1.863 17.47,-1.907 17.487,-1.953 17.499,-2.001 17.506,-2.05 17.508,-2.099 17.508,-3.299 17.506,-3.348 17.499,-3.396 17.487,-3.444 17.47,-3.49 17.449,-3.534 17.424,-3.576 17.395,-3.616 17.362,-3.652 17.325,-3.685 17.286,-3.714 17.244,-3.74 17.199,-3.761 17.153,-3.777 17.106,-3.789 17.057,-3.796 17.008,-3.799 16.908,-3.799 16.859,-3.801 16.811,-3.808 16.763,-3.82 16.717,-3.837 16.672,-3.858 16.63,-3.883 16.591,-3.912 16.555,-3.945 16.522,-3.981 16.492,-4.021 16.467,-4.063 16.446,-4.107 16.43,-4.153 16.418,-4.201 16.411,-4.25 16.408,-4.299 16.408,-5.199 16.406,-5.248 16.399,-5.296 16.387,-5.344 16.37,-5.39 16.349,-5.434 16.324,-5.476 16.295,-5.516 16.262,-5.552 16.225,-5.585 16.186,-5.614 16.144,-5.64 16.099,-5.66 16.053,-5.677 16.006,-5.689 15.957,-5.696 15.908,-5.699
VDCC on Top Layer "VDCC_L01_P020" (solid, pour order 20): -3.892,10.201 -3.941,10.199 -3.989,10.192 -4.037,10.18 -4.083,10.163 -4.128,10.142 -4.17,10.117 -4.209,10.088 -4.245,10.055 -4.278,10.019 -4.308,9.979 -4.333,9.937 -4.354,9.893 -4.37,9.847 -4.382,9.799 -4.389,9.75 -4.392,9.701 -4.392,9.201 -4.389,9.152 -4.382,9.104 -4.37,9.056 -4.354,9.01 -4.333,8.966 -4.308,8.924 -4.278,8.884 -4.245,8.848 -4.209,8.815 -4.17,8.786 -4.128,8.76 -4.083,8.739 -4.037,8.723 -3.989,8.711 -3.941,8.704 -3.892,8.701 -2.592,8.701 -2.543,8.704 -2.494,8.711 -2.447,8.723 -2.401,8.739 -2.356,8.76 -2.314,8.786 -2.275,8.815 -2.238,8.848 -2.205,8.884 -2.176,8.924 -2.151,8.966 -2.13,9.01 -2.113,9.056 -2.101,9.104 -2.094,9.152 -2.092,9.201 -2.092,11.551 -2.094,11.6 -2.101,11.649 -2.113,11.697 -2.13,11.743 -2.151,11.787 -2.176,11.829 -2.205,11.869 -2.238,11.905 -2.275,11.938 -2.314,11.967 -2.356,11.992 -2.401,12.013 -2.447,12.03 -2.494,12.042 -2.543,12.049 -2.592,12.051 -3.224,12.051 -3.26,12.05 -3.296,12.044 -3.331,12.036 -3.365,12.023 -3.398,12.008 -3.429,11.989 -3.457,11.968 -3.484,11.944 -3.508,11.917 -3.53,11.888 -3.548,11.857 -3.564,11.825 -3.576,11.791 -3.585,11.756 -3.59,11.72 -3.592,11.684 -3.592,11.669 -3.59,11.633 -3.585,11.597 -3.576,11.562 -3.564,11.528 -3.548,11.496 -3.53,11.465 -3.508,11.436 -3.484,11.409 -3.457,11.385 -3.429,11.363 -3.398,11.345 -3.365,11.329 -3.331,11.317 -3.296,11.308 -3.26,11.303 -3.224,11.301 -3.133,11.301 -3.09,11.299 -3.047,11.293 -3.005,11.282 -2.964,11.268 -2.925,11.249 -2.888,11.227 -2.853,11.201 -2.821,11.172 -2.792,11.14 -2.766,11.105 -2.744,11.068 -2.725,11.029 -2.711,10.988 -2.7,10.946 -2.694,10.904 -2.692,10.86 -2.692,10.701 -2.694,10.652 -2.701,10.604 -2.713,10.556 -2.73,10.51 -2.751,10.466 -2.776,10.424 -2.805,10.384 -2.838,10.348 -2.875,10.315 -2.914,10.286 -2.956,10.26 -3.001,10.239 -3.047,10.223 -3.094,10.211 -3.143,10.204 -3.192,10.201
+VUSB on Top Layer "+VUSB_L01_P013" (solid, remove dead copper, pour order 13): 15.318,-6.599 15.366,-6.601 15.414,-6.608 15.46,-6.62 15.506,-6.636 15.549,-6.656 15.59,-6.681 15.629,-6.71 15.665,-6.742 15.697,-6.778 15.726,-6.816 15.75,-6.858 15.771,-6.901 15.787,-6.946 15.799,-6.993 15.806,-7.041 15.808,-7.089 15.808,-7.109 15.806,-7.157 15.799,-7.204 15.787,-7.251 15.771,-7.296 15.75,-7.34 15.726,-7.381 15.697,-7.419 15.665,-7.455 15.629,-7.487 15.59,-7.516 15.549,-7.541 15.506,-7.561 15.46,-7.577 15.414,-7.589 15.366,-7.596 15.318,-7.599 13.298,-7.599 13.25,-7.601 13.203,-7.608 13.156,-7.62 13.111,-7.636 13.067,-7.656 13.026,-7.681 12.987,-7.71 12.952,-7.742 12.919,-7.778 12.891,-7.816 12.866,-7.858 12.845,-7.901 12.829,-7.946 12.818,-7.993 12.81,-8.041 12.808,-8.089 12.808,-8.109 12.806,-8.157 12.799,-8.204 12.787,-8.251 12.771,-8.296 12.75,-8.34 12.726,-8.381 12.697,-8.419 12.665,-8.455 12.629,-8.487 12.59,-8.516 12.549,-8.541 12.506,-8.561 12.46,-8.577 12.414,-8.589 12.366,-8.596 12.318,-8.599 12.208,-8.599 12.159,-8.596 12.111,-8.589 12.063,-8.577 12.017,-8.56 11.972,-8.54 11.93,-8.514 11.891,-8.485 11.855,-8.452 11.822,-8.416 11.792,-8.376 11.767,-8.334 11.746,-8.29 11.73,-8.244 11.718,-8.196 11.711,-8.148 11.708,-8.099 11.708,-7.099 11.711,-7.05 11.718,-7.001 11.73,-6.953 11.746,-6.907 11.767,-6.863 11.792,-6.821 11.822,-6.781 11.855,-6.745 11.891,-6.712 11.93,-6.683 11.972,-6.658 12.017,-6.637 12.063,-6.62 12.111,-6.608 12.159,-6.601 12.208,-6.599
+3V3 on Top Layer "+3V3_L01_P002" (solid, pour order 2): 5.1,-4.6 3.5,-4.6 3.2,-4.9 2.5,-4.9 2.5,-2.256 2.656,-2.1 4,-2.1 5.1,-3.2
GND on Bottom Layer "GND_L04_P031" (solid, pour order 31): 10.7,-6 10.749,-6.002 10.798,-6.01 10.845,-6.022 10.891,-6.038 10.936,-6.059 10.978,-6.084 11.017,-6.114 11.054,-6.146 11.086,-6.183 11.116,-6.222 11.141,-6.264 11.162,-6.309 11.178,-6.355 11.19,-6.402 11.198,-6.451 11.2,-6.5 11.2,-8.2 11.198,-8.249 11.19,-8.298 11.178,-8.345 11.162,-8.391 11.141,-8.436 11.116,-8.478 11.086,-8.517 11.054,-8.554 11.017,-8.587 10.978,-8.616 10.936,-8.641 10.891,-8.662 10.845,-8.678 10.798,-8.69 10.749,-8.698 10.7,-8.7 7.907,-8.7 7.858,-8.698 7.81,-8.69 7.762,-8.678 7.716,-8.662 7.671,-8.641 7.629,-8.616 7.59,-8.587 7.554,-8.554 5.269,-6.269 5.254,-6.252 5.24,-6.233 5.228,-6.214 5.218,-6.193 5.21,-6.171 5.205,-6.148 5.201,-6.125 5.2,-6.102 5.2,-6.098 5.2,-6.088 5.202,-6.079 5.204,-6.07 5.207,-6.061 5.212,-6.052 5.217,-6.044 5.222,-6.036 5.229,-6.029 5.236,-6.022 5.244,-6.017 5.252,-6.012 5.26,-6.007 5.27,-6.004 5.279,-6.002 5.288,-6 5.298,-6
+3V3 on Bottom Layer "+3V3_L04_P030" (solid, remove dead copper, pour order 30): -15.88,-18.12 -18.123,-15.878 cw(c-16.001,-13.756) -19.001,-13.756 -19.001,-12.079 cw(c-16.001,-12.079) -18.501,-10.421 ccw(c-21.001,-8.763) -18.001,-8.763 -18.001,8.765 ccw(c-21.001,8.765) -18.501,10.423 cw(c-16.001,12.082) -19.001,12.082 -19.001,13.758 cw(c-16.001,13.758) -18.123,15.88 -15.88,18.122 cw(c-13.759,16.001) -13.759,19.001 -10.83,19.001 ccw(c-10.83,22.001) -8.594,20.001 cw(c-6.358,18.001) -6.358,21.001 6.355,21.001 cw(c6.355,18.001) 8.591,20.001 ccw(c10.827,22.001) 10.827,19.001 13.756,19.001 cw(c13.756,16.001) 15.877,18.122 18.12,15.88 cw(c15.999,13.758) 18.999,13.758 18.999,12.082 cw(c15.999,12.082) 18.499,10.423 ccw(c20.999,8.765) 17.999,8.765 17.999,-8.763 ccw(c20.999,-8.763) 18.499,-10.421 cw(c15.999,-12.079) 18.999,-12.079 18.999,-13.756 cw(c15.999,-13.756) 18.12,-15.878 15.877,-18.12 cw(c13.756,-15.999) 13.756,-18.999 7.642,-18.999 cw(c7.642,-15.999) 5.406,-17.999 ccw(c3.17,-19.999) 3.17,-16.999 -3.173,-16.999 ccw(c-3.173,-19.999) -5.409,-17.999 cw(c-7.645,-15.999) -7.645,-18.999 -13.759,-18.999 cw(c-13.759,-15.999)
GND on Bottom Layer "GND_L04_P027" (solid, pour order 27): -8,-17.1 -15.9,-17.1 -17.25,-15.75 -17.25,-12.65 -15.1,-10.5 -8.2,-10.5 -7.25,-11.45 -7.25,-16.25
+VUSB on Bottom Layer "+VUSB_L04_P029" (solid, remove dead copper, pour order 29): 205 vertices, not listed, extent -3.173,-9.699 12.908,-4.499
VDCC on Bottom Layer "VDCC_L04_P028" (solid, remove dead copper, pour order 28): 171 vertices, not listed, extent -4.392,8.601 1.308,18.301
GND on Bottom Layer "GND_L04_P021" (solid, pour order 21): -0.9,1.4 -0.949,1.398 -0.998,1.39 -1.045,1.378 -1.091,1.362 -1.136,1.341 -1.178,1.316 -1.217,1.286 -1.254,1.254 -1.287,1.217 -1.316,1.178 -1.341,1.136 -1.362,1.091 -1.378,1.045 -1.39,0.998 -1.398,0.949 -1.4,0.9 -1.4,-0.9 -1.398,-0.949 -1.39,-0.998 -1.378,-1.045 -1.362,-1.091 -1.341,-1.136 -1.316,-1.178 -1.287,-1.217 -1.254,-1.254 -1.217,-1.287 -1.178,-1.316 -1.136,-1.341 -1.091,-1.362 -1.045,-1.378 -0.998,-1.39 -0.949,-1.398 -0.9,-1.4 0.9,-1.4 0.949,-1.398 0.998,-1.39 1.045,-1.378 1.091,-1.362 1.136,-1.341 1.178,-1.316 1.217,-1.287 1.254,-1.254 1.286,-1.217 1.316,-1.178 1.341,-1.136 1.362,-1.091 1.378,-1.045 1.39,-0.998 1.398,-0.949 1.4,-0.9 1.4,0.9 1.398,0.949 1.39,0.998 1.378,1.045 1.362,1.091 1.341,1.136 1.316,1.178 1.286,1.217 1.254,1.254 1.217,1.286 1.178,1.316 1.136,1.341 1.091,1.362 1.045,1.378 0.998,1.39 0.949,1.398 0.9,1.4
+1V1 on Bottom Layer "+1V1_L04_P011" (solid, pour order 11): 341 vertices, not listed, extent -6.7,-4.6 6.6,2.5
GND on Inner GND 2 "GND_L03_P010" (solid, remove dead copper, pour order 10): -15.88,-18.12 -18.123,-15.878 cw(c-16.001,-13.756) -19.001,-13.756 -19.001,-12.079 cw(c-16.001,-12.079) -18.501,-10.421 ccw(c-21.001,-8.763) -18.001,-8.763 -18.001,8.765 ccw(c-21.001,8.765) -18.501,10.423 cw(c-16.001,12.082) -19.001,12.082 -19.001,13.758 cw(c-16.001,13.758) -18.123,15.88 -15.88,18.122 cw(c-13.759,16.001) -13.759,19.001 -10.83,19.001 ccw(c-10.83,22.001) -8.594,20.001 cw(c-6.358,18.001) -6.358,21.001 6.355,21.001 cw(c6.355,18.001) 8.591,20.001 ccw(c10.827,22.001) 10.827,19.001 13.756,19.001 cw(c13.756,16.001) 15.877,18.122 18.12,15.88 cw(c15.999,13.758) 18.999,13.758 18.999,12.082 cw(c15.999,12.082) 18.499,10.423 ccw(c20.999,8.765) 17.999,8.765 17.999,-8.763 ccw(c20.999,-8.763) 18.499,-10.421 cw(c15.999,-12.079) 18.999,-12.079 18.999,-13.756 cw(c15.999,-13.756) 18.12,-15.878 15.877,-18.12 cw(c13.756,-15.999) 13.756,-18.999 7.642,-18.999 cw(c7.642,-15.999) 5.406,-17.999 ccw(c3.17,-19.999) 3.17,-16.999 -3.173,-16.999 ccw(c-3.173,-19.999) -5.409,-17.999 cw(c-7.645,-15.999) -7.645,-18.999 -13.759,-18.999 cw(c-13.759,-15.999)
GND on Inner GND 1 "GND_L02_P009" (solid, remove dead copper, pour order 9): -15.88,-18.12 -18.123,-15.878 cw(c-16.001,-13.756) -19.001,-13.756 -19.001,-12.079 cw(c-16.001,-12.079) -18.501,-10.421 ccw(c-21.001,-8.763) -18.001,-8.763 -18.001,8.765 ccw(c-21.001,8.765) -18.501,10.423 cw(c-16.001,12.082) -19.001,12.082 -19.001,13.758 cw(c-16.001,13.758) -18.123,15.88 -15.88,18.122 cw(c-13.759,16.001) -13.759,19.001 -10.83,19.001 ccw(c-10.83,22.001) -8.594,20.001 cw(c-6.358,18.001) -6.358,21.001 6.355,21.001 cw(c6.355,18.001) 8.591,20.001 ccw(c10.827,22.001) 10.827,19.001 13.756,19.001 cw(c13.756,16.001) 15.877,18.122 18.12,15.88 cw(c15.999,13.758) 18.999,13.758 18.999,12.082 cw(c15.999,12.082) 18.499,10.423 ccw(c20.999,8.765) 17.999,8.765 17.999,-8.763 ccw(c20.999,-8.763) 18.499,-10.421 cw(c15.999,-12.079) 18.999,-12.079 18.999,-13.756 cw(c15.999,-13.756) 18.12,-15.878 15.877,-18.12 cw(c13.756,-15.999) 13.756,-18.999 7.642,-18.999 cw(c7.642,-15.999) 5.406,-17.999 ccw(c3.17,-19.999) 3.17,-16.999 -3.173,-16.999 ccw(c-3.173,-19.999) -5.409,-17.999 cw(c-7.645,-15.999) -7.645,-18.999 -13.759,-18.999 cw(c-13.759,-15.999)

## Other copper
Top Layer:
  pour cut-out: -15.725,1.056 -15.725,-1.406 -13.85,-1.406 -13.85,1.056
  pour cut-out: -12.525,-2.956 -12.525,-0.494 -14.4,-0.494 -14.4,-2.956
  pour cut-out: 4.798,14.084 4.798,12.734 2.7,12.734 2.7,14.084 3.873,14.084
Bottom Layer:
  pour cut-out: -6.8,-5.4 -4.654,-3.7 -9.1,0.746 -9.1,8.518 -8.209,9.409 -10.2,11.4 -11.9,9.7 -11.9,-0.3 -7.2,-5

## Silkscreen, mask and mechanical layers (free items; w line width, h text height)
Top Overlay:
  text "FUN" at 5.747,11.932 h1.5 r270
  text "BOOT" at 12.738,8.332 h1.5 r270
  text "RESET" at -12.739,-8.498 h1.5 r90
Bottom Overlay:
  lines w0.084: -15,2 15,2 15,9.5 -15,9.5 -15,2
  text "Rev. 1 - LZ" at 3.183,-15.45 h1.5
Mechanical 1:
  circle w0.006: c-0.001,0.001 r0.003
  lines w0.013: -19.001,-13.756 ccw(c-16.001,-13.756) -18.123,-15.878 -15.88,-18.12 ccw(c-13.759,-15.999) -13.759,-18.999 -7.645,-18.999 ccw(c-7.645,-15.999) -5.409,-17.999 cw(c-3.173,-19.999) -3.173,-16.999 3.17,-16.999 cw(c3.17,-19.999) 5.406,-17.999 ccw(c7.642,-15.999) 7.642,-18.999 13.756,-18.999 ccw(c13.756,-15.999) 15.877,-18.12 18.12,-15.878 ccw(c15.999,-13.756) 18.999,-13.756 18.999,-12.079 ccw(c15.999,-12.079) 18.499,-10.421 cw(c20.999,-8.763) 17.999,-8.763 17.999,8.765 cw(c20.999,8.765) 18.499,10.423 ccw(c15.999,12.082) 18.999,12.082 18.999,13.758 ccw(c15.999,13.758) 18.12,15.88 15.877,18.122 ccw(c13.756,16.001) 13.756,19.001 10.827,19.001 cw(c10.827,22.001) 8.591,20.001 ccw(c6.355,18.001) 6.355,21.001 -6.358,21.001 ccw(c-6.358,18.001) -8.594,20.001 cw(c-10.83,22.001) -10.83,19.001 -13.759,19.001 ccw(c-13.759,16.001) -15.88,18.122 -18.123,15.88 ccw(c-16.001,13.758) -19.001,13.758 -19.001,12.082 ccw(c-16.001,12.082) -18.501,10.423 cw(c-21.001,8.765) -18.001,8.765 -18.001,-8.763 cw(c-21.001,-8.763) -18.501,-10.421 ccw(c-16.001,-12.079) -19.001,-12.079 -19.001,-13.756
Mechanical 20:
  circle w0.006: c0,12.5 r0.003
  circle w0.006: c0,0 r0.003